# Altium PCB BLDC-Driver-v2.0.PcbDoc (part 2 of 6)
Units mil, origin at the board's own origin, x right, y up, seen from the top; angles counter-clockwise.
Board outline 5905.51 x 4330.71 mil, 4 copper layers (Top Layer, Layer 1, Layer 2, Bottom Layer), stack 62.047 mil thick; 284 components, 198 nets, 819 pads, 521 vias.
Unrouted connection lines stored in the file: 1.
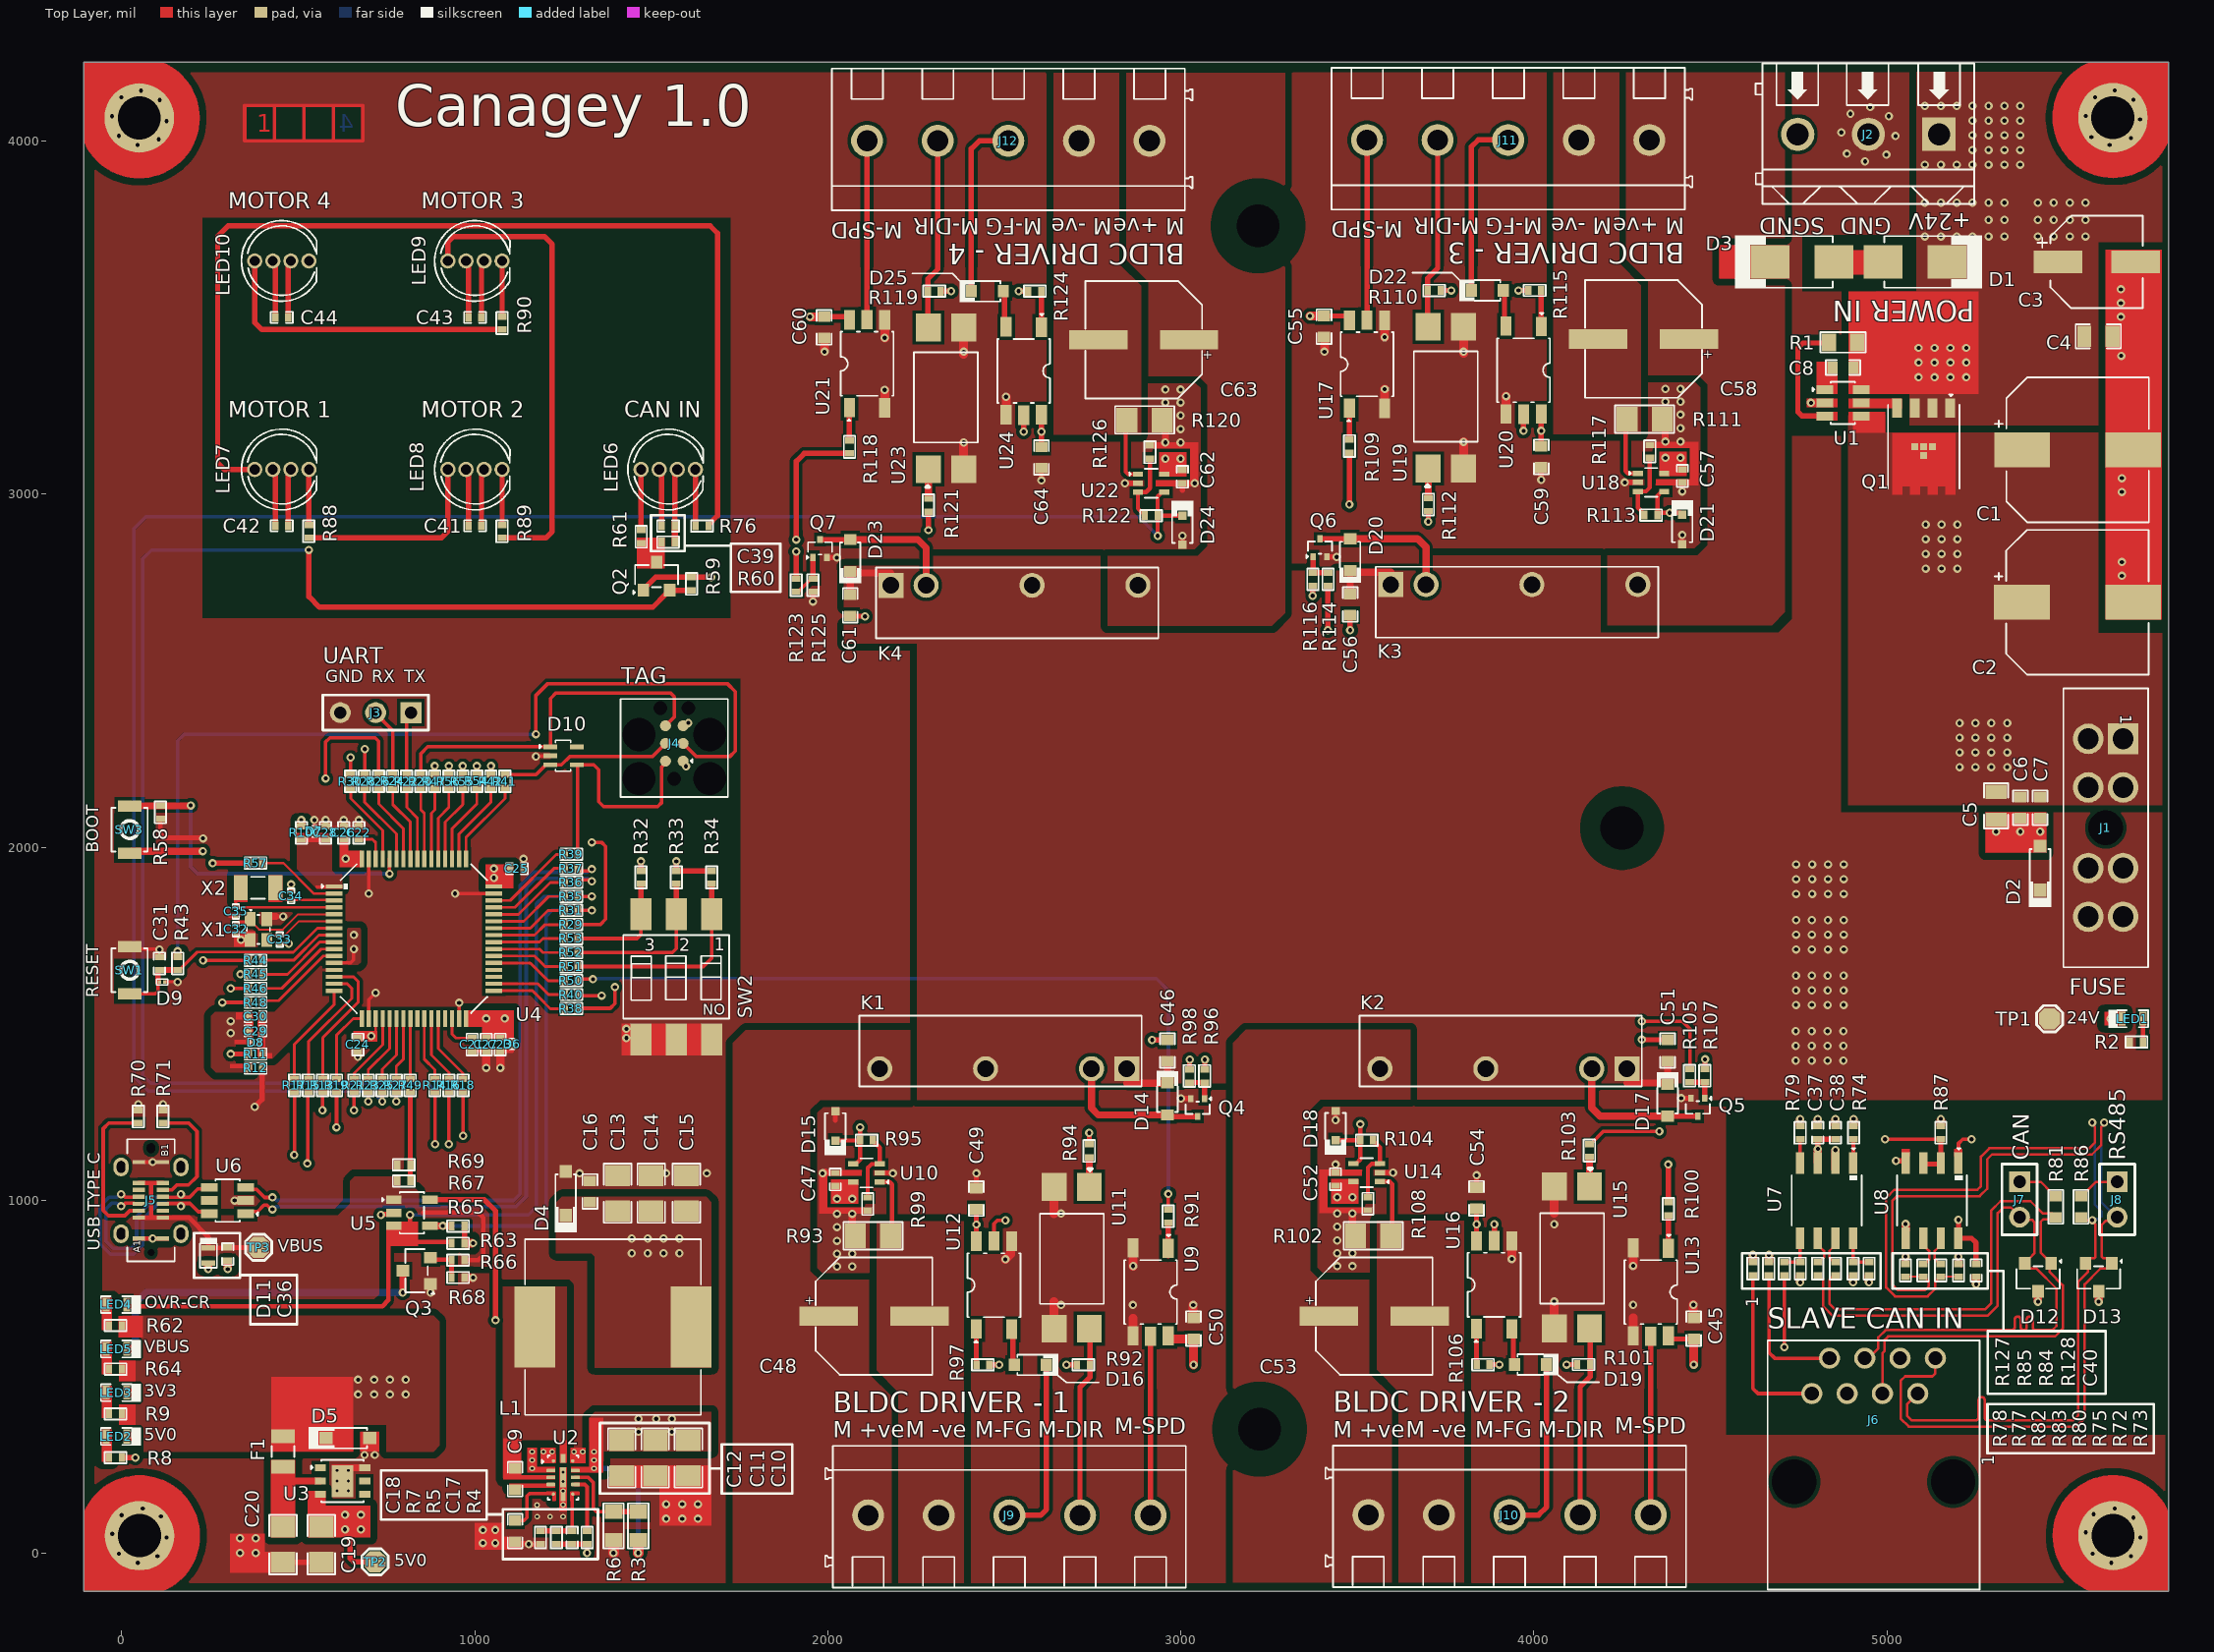
[diagram p0: Top Layer view]

## Part data (continued)
C28 C29: library part CC0402KRX5R7BB105, "CAP CER 1UF 16V X5R 0402", Case Code (Imperial)=0402, Case Code (Metric)=1005, Dielectric=X5R, LCSC Part Number=C325464, Manufacturer=Yageo, Max Operating Temperature=85°C, Min Operating Temperature=-55°C, Supplier Part Number 1=311-1691-6-ND, Tolerance=10%, Voltage Rating=16V, Capacitance=1uF, Case/Package=0402, ComponentLink1Description=http://www.yageo.com/documents/recent/UPY-GPHC_X5R_4V-to-50V_12.pdf?src-supplier=Avnet+Europe, ComponentLink1URL=http://www.yageo.com/documents/recent/UPY-GPHC_X5R_4V-to-50V_12.pdf?src-supplier=Avnet+Europe, Composition=Ceramic, Depth=0.5mm, Halogen Free="Halogen Free", Height=0.5mm, Item Type=Capacitor, Lead Free="Lead Free", Length=1mm, Manufacturer Part Number=CC0402KRX5R7BB105, Mount="Surface Mount", Packaging="Tape and Reel", Pricing 1="1=0.36, 10=0.252, 100=0.1512, 500=0.1134, 1000=0.09576, 2500=0.09072, 5000=0.08568 (USD)", Radiation Hardening=No, Stock 1=1405667, Supplier 1=Digi-Key, Termination=SMD/SMT, Thickness=0.022inch, Voltage Rating (DC)=16V, Weight=2.3E-05oz, Width=0.02inch
C32 C33 C34 C35: library part CC0201JRNPO9BN150, "CAP CER 15PF 50V C0G/NPO 0201", LCSC Part Number=C277480, Manufacturer=Yageo, Supplier Part Number=2580314, Category="Ceramic Capacitors", ComponentLink1Description=https://datasheet.ciiva.com/176/mlccorderingcode-176501.pdf?src-supplier=Digi-Key, ComponentLink1URL=https://datasheet.ciiva.com/176/mlccorderingcode-176501.pdf?src-supplier=Digi-Key, ComponentLink2Description=https://datasheet.ciiva.com/176/mlccorderingcode-176502.pdf?src-supplier=Digi-Key, ComponentLink2URL=https://datasheet.ciiva.com/176/mlccorderingcode-176502.pdf?src-supplier=Digi-Key, ComponentLink3Description=https://datasheet.ciiva.com/176/mlccorderingcode-176503.pdf?src-supplier=Digi-Key, ComponentLink3URL=https://datasheet.ciiva.com/176/mlccorderingcode-176503.pdf?src-supplier=Digi-Key, ComponentLink4Description=https://datasheet.ciiva.com/17205/upy-gp-np0-16v-to-50v-8-17205625.pdf?src-supplier=Future+Electronics, ComponentLink4URL=https://datasheet.ciiva.com/17205/upy-gp-np0-16v-to-50v-8-17205625.pdf?src-supplier=Future+Electronics, Item Type=Capacitor, Manufacturer Part Number=CC0201JRNPO9BN150, Pricing="15000=0.0012, 60000=0.0011, 225000=0.0011, 600000=0.001, 1500000=0.001 (USD)", RoHS=Yes, Stock=585000, Supplier="Future Electronics"
C48 C53 C58 C63: library part SVZ1VM221FBRE00RAXXX, "35V 220uF ±20% 30mΩ@100kHz 2.4A@100kHz SMD,D8xL11.5mm Polymer Aluminum Capacitors ROHS", LCSC Part Number=C2923769, Manufacturer=KNSCHA, Package=SMD,D8xL11.5mm, ComponentLink1Description=LCSC, ComponentLink1URL=https://www.lcsc.com/product-detail/Polymer-Aluminum-Capacitors_AISHI-Aihua-Group-SVZ1VM221FBRE00RAXXX_C2923769.html, Item Type=Capacitor, Manufacturer Part Number=C2923769
D1: "TVS DIODE 58VWM 93.6VC SMB", LCSC Part Number=C135085, Manufacturer=Diodes, ComponentLink1Description=https://datasheet.ciiva.com/25624/0900766b8104bed2-25624843.pdf?src-supplier=Rs, ComponentLink1URL=https://datasheet.ciiva.com/25624/0900766b8104bed2-25624843.pdf?src-supplier=Rs, ComponentLink2Description=https://datasheet.ciiva.com/15143/getdatasheetpartid-39642-15143045.pdf?src-supplier=Verical, ComponentLink2URL=https://datasheet.ciiva.com/15143/getdatasheetpartid-39642-15143045.pdf?src-supplier=Verical, ComponentLink3Description=https://datasheet.ciiva.com/4520/ds19002-4520617.pdf?src-supplier=Mouser, ComponentLink3URL=https://datasheet.ciiva.com/4520/ds19002-4520617.pdf?src-supplier=Mouser, ComponentLink4Description=https://datasheet.ciiva.com/16393/ds19002-16393005.pdf?src-supplier=Future+Electronics, ComponentLink4URL=https://datasheet.ciiva.com/16393/ds19002-16393005.pdf?src-supplier=Future+Electronics, Item Type=Diode, Manufacturer Part Number=SMBJ58A-13-F, Pricing="3000=0.0711, 9000=0.0684, 15000=0.0671, 30000=0.0655, 60000=0.063 (USD)", RoHS=Yes, Stock=6000, Supplier="Future Electronics"
D2: "26.7V 24V SOD-123 ESD and Surge Protection (TVS/ESD) ROHS", LCSC Part Number=C5571859, Manufacturer=AMAZING, Package=SOD-123, ComponentLink1Description=LCSC, ComponentLink1URL=https://www.lcsc.com/product-detail/ESD-and-Surge-Protection-TVS-ESD_AMAZING-AZ4024-01G_C5571859.html, Item Type=(TVS/ESD), Manufacturer Part Number=AZ4024-01G
D3: "TVS DIODE 26VWM 42.1VC SMB", LCSC Part Number=C135062, Manufacturer=Diodes, Supplier Part Number=3363900, ComponentLink1Description=https://datasheet.ciiva.com/15143/getdatasheetpartid-118169-15143570.pdf?src-supplier=Verical, ComponentLink1URL=https://datasheet.ciiva.com/15143/getdatasheetpartid-118169-15143570.pdf?src-supplier=Verical, ComponentLink2Description=https://datasheet.ciiva.com/16211/ds19002-16211003.pdf?src-supplier=Future+Electronics, ComponentLink2URL=https://datasheet.ciiva.com/16211/ds19002-16211003.pdf?src-supplier=Future+Electronics, Item Type="TVS Diodes", Manufacturer Part Number=SMBJ26A-13-F, Pricing="3000=0.0717, 9000=0.069, 15000=0.0677, 30000=0.0661, 60000=0.0635 (USD)", RoHS=Yes, Stock=9000, Supplier="Future Electronics"
D4: "6V 5V SOD-123 ESD and Surge Protection (TVS/ESD) ROHS", LCSC Part Number=C7079241, Manufacturer=AMAZING, Package=SOD-123, ComponentLink1Description=LCSC, ComponentLink1URL=https://www.lcsc.com/product-detail/ESD-and-Surge-Protection-TVS-ESD_AMAZING-AZ3005-01G_C7079241.html, Item Type=(TVS/ESD), Manufacturer Part Number=AZ3005-01G
D5: "TVS SURGE PROTECTOR 1-CH 3.3V", LCSC Part Number=-, Manufacturer=Amazing, Package=SOD-123, ComponentLink1Description=Digikey, ComponentLink1URL=https://www.digikey.com/en/products/detail/amazing/AZ3003-01G/16615352?s=N4IgTCBcDaIIIC0DMAGFSC0KCMBxEAugL5A, Item Type=Diode, Manufacturer Part Number=AZ3003-01G
D6 D7 D8 D9: "DIODE BIDIR ESD X4DFN2", LCSC Part Number=C896720, Manufacturer="ON Semiconductor", Item Type=(TVS/ESD), Manufacturer Part Number=ESDM2033MX4T5G, Pricing="8961=0.04129, 9000=0.04018, 18000=0.03906, 45000=0.03794, 90000=0.03683, 450000=0.03571, 900000=0.0346 (USD)", RoHS=Yes, Series=-, Stock=629400, Supplier=Avnet
D10: "TVS DIODE 3VWM SOT323-5", LCSC Part Number=C703691, Manufacturer=STMicroelectronics, ComponentLink1Description=https://datasheet.ciiva.com/23847/cd00002946-23847220.pdf?src-supplier=Newark, ComponentLink1URL=https://datasheet.ciiva.com/23847/cd00002946-23847220.pdf?src-supplier=Newark, ComponentLink2Description=https://datasheet.ciiva.com/4509/cd00002946-81943-4509940.pdf?src-supplier=Mouser, ComponentLink2URL=https://datasheet.ciiva.com/4509/cd00002946-81943-4509940.pdf?src-supplier=Mouser, ComponentLink3Description=https://datasheet.ciiva.com/5782/cd00002946-5782886.pdf?src-supplier=Farnell, ComponentLink3URL=https://datasheet.ciiva.com/5782/cd00002946-5782886.pdf?src-supplier=Farnell, ComponentLink4Description=https://datasheet.ciiva.com/338/cd00002946-338376.pdf?src-supplier=Digikey, ComponentLink4URL=https://datasheet.ciiva.com/338/cd00002946-338376.pdf?src-supplier=Digikey, ComponentLink5Description=https://datasheet.ciiva.com/338/cd00002946-338377.pdf?src-supplier=Digikey, ComponentLink5URL=https://datasheet.ciiva.com/338/cd00002946-338377.pdf?src-supplier=Digikey, ComponentLink6Description=https://datasheet.ciiva.com/338/cd00002946-338378.pdf?src-supplier=Digikey, ComponentLink6URL=https://datasheet.ciiva.com/338/cd00002946-338378.pdf?src-supplier=Digikey, Item Type="TVS Diodes", Manufacturer Part Number=ESDALC6V1W5, Pricing="3000=0.0569, 9000=0.0547, 12000=0.0774, 15000=0.0538, 30000=0.0749, 45000=0.0518, 75000=0.05 (USD)", RoHS=Yes, Stock=3000, Supplier="Future Electronics"
D11: "TVS DIODE 5VWM 11.6VC 1610", Case Code (Imperial)=0603, Case Code (Metric)=1610, LCSC Part Number=C1975146, Manufacturer=STMicroelectronics, Max Breakdown Voltage=7.2V, Max Operating Temperature=150°C, Min Breakdown Voltage=6.4V, Min Operating Temperature=-55°C, Peak Pulse Current=60A, Peak Pulse Power=700W, Power Line Protection=No, Reverse Standoff Voltage=5V, Case/Package=0603, ComponentLink1Description=http://www.farnell.com/datasheets/2041290.pdf?src-supplier=Farnell, ComponentLink1URL=http://www.farnell.com/datasheets/2041290.pdf?src-supplier=Farnell, ComponentLink2Description=http://www.farnell.com/datasheets/2041290.pdf?src-supplier=Element14, ComponentLink2URL=http://www.farnell.com/datasheets/2041290.pdf?src-supplier=Element14, ComponentLink3Description=http://www.st.com/content/ccc/resource/technical/document/datasheet/44/e9/26/44/42/ee/4f/e5/DM00139972.pdf/files/DM00139972.pdf/jcr:content/translations/en.DM00139972.pdf?src-supplier=Digikey, ComponentLink3URL=http://www.st.com/content/ccc/resource/technical/document/datasheet/44/e9/26/44/42/ee/4f/e5/DM00139972.pdf/files/DM00139972.pdf/jcr:content/translations/en.DM00139972.pdf?src-supplier=Digikey, Diode Type=ZENER, Item Type="TVS Diodes", Manufacturer Part Number=ESDA7P60-1U1M, Mounting Technology="Surface Mount", Number of Unidirectional Channels=1, Packaging="Cut Tape", Pins=2, Polarity=Unidirectional, Pricing="1=0.37, 10=0.245, 50=0.245, 100=0.166, 1000=0.097, 10000=0.077 (USD)", Reach SVHC Compliant=No, RoHS=Yes, RoHS Compliant=Yes, Series=ESDA, Stock=24694, Supplier=Mouser
D12: "TVS DIODE 24VWM 40VC SOT23-3", LCSC Part Number=C350941, Manufacturer=Bourns, ComponentLink1Description=http://www.farnell.com/datasheets/2372435.pdf?src-supplier=Farnell, ComponentLink1URL=http://www.farnell.com/datasheets/2372435.pdf?src-supplier=Farnell, ComponentLink2Description=https://www.bourns.com/docs/Product-Datasheets/cdsot23-t24can-Q.pdf?src-supplier=Digikey, ComponentLink2URL=https://www.bourns.com/docs/Product-Datasheets/cdsot23-t24can-Q.pdf?src-supplier=Digikey, ComponentLink3Description=http://www.farnell.com/datasheets/2372435.pdf?src-supplier=Newark, ComponentLink3URL=http://www.farnell.com/datasheets/2372435.pdf?src-supplier=Newark, Item Type="TVS Diodes", Manufacturer Part Number=CDSOT23-T24CAN-Q, Pricing="1=0.36, 10=0.282, 100=0.1691, 500=0.15656, 1000=0.10645, 3000=0.098, 6000=0.09393, 9000=0.08454, 30000=0.08328, 75000=0.07827 (USD)", RoHS=Yes, RoHS Compliant=5897YesNo, Stock=17231, Supplier=Digikey
D13: "SOT-23 TVS ROHS", LCSC Part Number=C521963, Manufacturer="TECH PUBLIC", Package=SOT-23, ComponentLink1Description=LCSC, ComponentLink1URL=https://www.lcsc.com/product-detail/TVS_TECH-PUBLIC-SM712_C521963.html, Item Type=Diode, Manufacturer Part Number=SM712
D14 D16 D17 D19 D20 D22 D23 D25: "DIODE GEN PURP 75V 150MA SOD323", Average Rectified Current=150mA, Capacitance=2pF, Forward Current=300mA, Forward Voltage=1.25V, LCSC Part Number=C60580, Manufacturer=Diodes, Max Forward Surge Current (Ifsm)=2A, Max Operating Temperature=150°C, Max Repetitive Reverse Voltage (Vrrm)=75V, Max Reverse Current=1uA, Min Operating Temperature=-65°C, Package Quantity=3000, Power Dissipation=200mW, Supplier Part Number 1=621-1N4148WS-F, Category="Rectifier Diodes", ComponentLink1Description=https://datasheet.ciiva.com/1179/ds30097-1179355.pdf?src-supplier=Element14, ComponentLink1URL=https://datasheet.ciiva.com/1179/ds30097-1179355.pdf?src-supplier=Element14, ComponentLink2Description=https://datasheet.ciiva.com/8300/ds30097-8300396.pdf?src-supplier=Avnet, ComponentLink2URL=https://datasheet.ciiva.com/8300/ds30097-8300396.pdf?src-supplier=Avnet, ComponentLink3Description=https://datasheet.ciiva.com/16199/ds30097-16199061.pdf?src-supplier=Future+Electronics, ComponentLink3URL=https://datasheet.ciiva.com/16199/ds30097-16199061.pdf?src-supplier=Future+Electronics, ComponentLink4Description=https://datasheet.ciiva.com/911/ds30097-911742.pdf?src-supplier=Digi-Key, ComponentLink4URL=https://datasheet.ciiva.com/911/ds30097-911742.pdf?src-supplier=Digi-Key, ComponentLink5Description=https://datasheet.ciiva.com/911/ds30097-911743.pdf?src-supplier=Digi-Key, ComponentLink5URL=https://datasheet.ciiva.com/911/ds30097-911743.pdf?src-supplier=Digi-Key, ComponentLink6Description=https://datasheet.ciiva.com/911/ds30097-911741.pdf?src-supplier=Digi-Key, ComponentLink6URL=https://datasheet.ciiva.com/911/ds30097-911741.pdf?src-supplier=Digi-Key, Contact Plating=Tin,Matte, Current Rating=150mA, Element Configuration=Single, Height=1mm, Item Type=Diode, Lead Free="Lead Free", Length=1.8mm, Manufacturer Part Number=1N4148WS-7-F, Max Reverse Voltage (DC)=75V, Max Surge Current=2A, Mount="Surface Mount", Number of Pins=2, Output Current=150mA, Packaging="Tape and Reel", Peak Non-Repetitive Surge Current=2A, Polarity=Standard, Power Rating=200mW, Pricing 1="1=0.19000, 10=0.17500, 50=0.17500, 100=0.09600, 500=0.05900, 1000=0.04000, 3000=0.03000, 9000=0.02600, 10000=0.02600, 24000=0.02300, 45000=0.01900 (USD)", Radiation Hardening=No, REACH SVHC="No SVHC", Recovery Time=4ns, Reverse Recovery Time=4ns, Reverse Recovery Time-Max=4ns, RoHS=Yes, RoHS Compliant=Yes, Series=-, Supplier 1=Mouser, Voltage=75V, Voltage Rating (DC)=75V, Weight=0.000173oz, Width=1.4mm
D15 D18 D21 D24: "DIODE ZENER 3.3V 200MW SOD323F", Forward Voltage=1V, LCSC Part Number=C2978865, Manufacturer="ON Semiconductor / Fairchild", Max Operating Temperature=150°C, Max Power Dissipation=200mW, Max Reverse Leakage Current=4.5uA, Min Operating Temperature=-65°C, Package Quantity=1, Supplier Part Number 1=MM3Z3V3BCT-ND, Test Current=5mA, Tolerance=2%, Working Voltage=3.3V, ComponentLink1Description=http://www.onsemi.com/pub/Collateral/MM3Z9V1B-D.pdf?src-supplier=Digi-Key, ComponentLink1URL=http://www.onsemi.com/pub/Collateral/MM3Z9V1B-D.pdf?src-supplier=Digi-Key, ComponentLink2Description=http://www.mouser.com/ds/2/149/MM3Z3V3B-187166.pdf?src-supplier=Mouser, ComponentLink2URL=http://www.mouser.com/ds/2/149/MM3Z3V3B-187166.pdf?src-supplier=Mouser, ComponentLink3Description=https://www.fairchildsemi.com/datasheets/MM/MM3Z9V1B.pdf?src-supplier=Avnet, ComponentLink3URL=https://www.fairchildsemi.com/datasheets/MM/MM3Z9V1B.pdf?src-supplier=Avnet, ComponentLink4Description=http://www.farnell.com/datasheets/1706525.pdf?src-supplier=Element14, ComponentLink4URL=http://www.farnell.com/datasheets/1706525.pdf?src-supplier=Element14, Element Configuration=Single, Height=1mm, Impedance=89R, Item Type=Diode, Lead Free="Lead Free", Length=1.3mm, Manufacturer Part Number=MM3Z3V3B, Mount="Surface Mount", Number of Pins=2, Packaging="Tape and Reel", Peak Reverse Current=4.5uA, Power Dissipation=200mW, Pricing 1="1=0.22, 10=0.18, 100=0.0956, 500=0.06288, 1000=0.04276 (USD)", Radiation Hardening=No, REACH SVHC="No SVHC", Stock 1=473644, Supplier 1=Digi-Key, Voltage Tolerance=2%, Weight=0.0276g, Width=1.7mm, Zener Voltage=3.3V
F1: "PTC RESET FUSE 6V 1.1A 0805", LCSC Part Number=C207024, Manufacturer=Littelfuse, ComponentLink1Description=https://datasheet.ciiva.com/326/littelfuse-resettable-ptcs-lorho-datasheet-326160.pdf?src-supplier=Digikey, ComponentLink1URL=https://datasheet.ciiva.com/326/littelfuse-resettable-ptcs-lorho-datasheet-326160.pdf?src-supplier=Digikey, ComponentLink2Description=https://datasheet.ciiva.com/28410/949281-28410775.pdf?src-supplier=Element14, ComponentLink2URL=https://datasheet.ciiva.com/28410/949281-28410775.pdf?src-supplier=Element14, Item Type=Fuses, Manufacturer Part Number=0805L110SLYR, Pricing="1=1.74, 5=1.448, 10=1.339, 50=1.1156, 100=1.0309, 250=0.92832, 500=0.85714, 1000=0.79108 (USD)", RoHS=Yes, Stock=3032, Supplier=Digikey
J1: "FUSE HOLDER BLADE 80V PCB", Current Rating=30A, LCSC Part Number=C207061, Manufacturer="Littelfuse Wickmann", Supplier Part Number=9883406, Body Material=4896ConductorMaterial, Category="Fuse Holders", ComponentLink1Description=https://datasheet.ciiva.com/295/littelfuse-ato-pcb-fuse-holders-178-6765-295568.pdf?src-supplier=Digikey, ComponentLink1URL=https://datasheet.ciiva.com/295/littelfuse-ato-pcb-fuse-holders-178-6765-295568.pdf?src-supplier=Digikey, ComponentLink2Description=https://datasheet.ciiva.com/4480/flrholder-58019-4480354.pdf?src-supplier=Mouser, ComponentLink2URL=https://datasheet.ciiva.com/4480/flrholder-58019-4480354.pdf?src-supplier=Mouser, ComponentLink3Description=https://datasheet.ciiva.com/16372/flrholder-16372408.pdf?src-supplier=Future+Electronics, ComponentLink3URL=https://datasheet.ciiva.com/16372/flrholder-16372408.pdf?src-supplier=Future+Electronics, ComponentLink4Description=https://datasheet.ciiva.com/15187/getdatasheetpartid-31610-15187861.pdf?src-supplier=Verical, ComponentLink4URL=https://datasheet.ciiva.com/15187/getdatasheetpartid-31610-15187861.pdf?src-supplier=Verical, Item Type="Fuse Holder", Lead Free=5697LeadFree, Manufacturer Part Number=178.6165.0002, Material=4896ConductorMaterial, Pricing="1=2.02, 40=1.96, 125=1.91, 400=1.86, 1250=1.77 (USD)", RoHS=Yes, Stock=3811, Supplier="Future Electronics", Thickness=6mm, Width=17.5mm
J2: "1x3P 18A -40℃~+105℃ 250V Orange 12~30 Direct Insert 5.08mm 2.5 1 3 Plugin,P=5.08mm Screw Terminal Blocks ROHS", LCSC Part Number=C430604, Manufacturer=DORABO, Package=Plugin,P=5.08mm, ComponentLink1Description=LCSC, ComponentLink1URL=https://www.lcsc.com/product-detail/Screw-Terminal-Blocks_DORABO-DB128L-5-08-3P-OG-S_C430604.html, Item Type="Terminal Block", Manufacturer Part Number=DB128L-5.08-3P-OG-S
J3: "Gold 250V 3A Straight Square Pins 2.5mm 3P 260℃ 6mm -40℃~+105℃ 3mm 2.54mm Plugin Black Brass 1x3P Plugin,P=2.54mm Pin Headers ROHS", LCSC Part Number=C706875, Manufacturer=XKB, Package=Plugin,P=2.54mm, ComponentLink1Description=LCSC, ComponentLink1URL=https://www.lcsc.com/product-detail/Pin-Headers_XKB-Connectivity-X6511WV-03H-C60D30_C706875.html, Item Type="Male Header", Manufacturer Part Number=X6511WV-03H-C60D30
J4: "CABLE ADAPTER 6 POS", Manufacturer=Tag-Connect, Package Quantity=1, Supplier Part Number 1=TC2030-IDC-ND, ComponentLink1Description=http://www.tag-connect.com/Materials/TC2030-MCP%20Datasheet.pdf?src-supplier=Digi-Key, ComponentLink1URL=http://www.tag-connect.com/Materials/TC2030-MCP%20Datasheet.pdf?src-supplier=Digi-Key, Manufacturer Part Number=TC2030-IDC, Pricing 1="1=43.71 (USD)", Stock 1=284, Supplier 1=Digi-Key
J5: "5A 1 16P Mother -25℃~+85℃ Type-C SMD USB Connectors ROHS", LCSC Part Number=C2938598, Manufacturer="XKB Connection", Package=SMD, ComponentLink1Description=LCSC, ComponentLink1URL=https://www.lcsc.com/product-detail/USB-Connectors_XKB-Connection-U263-163N-4BQC65_C2938598.html, Item Type="USB Connectors", Manufacturer Part Number=U263-163N-4BQC65
J6: "RJ45Receptacle Unshielded 1 Bend-in Gold Phosphor Bronze Without LED Plugin Ethernet Connectors / Modular Connectors (RJ45 RJ11) ROHS", LCSC Part Number=C3000205, Manufacturer=HCTL, Package=Custom, ComponentLink1Description=LCSC, ComponentLink1URL=https://www.lcsc.com/product-detail/Ethernet-Connectors-Modular-Connectors-RJ45-RJ11_HCTL-HC-RJ45-5622-1-6-Y_C3000205.html, Item Type="Ethernet Connectors", Manufacturer Part Number=HC-RJ45-5622-1-6-Y
J7 J8: "Gold 250V 3A Straight Square Pins 2.5mm 2P 260℃ 6mm -40℃~+105℃ 3mm 2.54mm Plugin Black Brass 1x2P Plugin,P=2.54mm Pin Headers ROHS", LCSC Part Number=C706874, Manufacturer=XKB, Package=Plugin,P=2.54mm, ComponentLink1Description=LCSC, ComponentLink1URL=https://www.lcsc.com/product-detail/Pin-Headers_XKB-Connectivity-X6511WV-02H-C60D30_C706874.html, Item Type="Male Header", Manufacturer Part Number=X6511WV-02H-C60D30
J9 J10 J11 J12: "1x5P 20A -40℃~+105℃ 300V Green 12~30 Direct Insert 5.08mm 2.5 1 5 Plugin,P=5.08mm Screw Terminal Blocks ROHS", LCSC Part Number=C2927513, Manufacturer=DORABO, Package=Plugin,P=5.08mm, ComponentLink1Description=LCSC, ComponentLink1URL=https://www.lcsc.com/product-detail/Screw-Terminal-Blocks_DORABO-DB128V-5-08-5P-GN-S_C2927513.html, Item Type="Terminal Block", Manufacturer Part Number=DB128V-5.08-5P-GN-S
K1 K2 K3 K4: "RELAY GEN PURPOSE SPST 5A 24V", LCSC Part Number=C397209, Manufacturer=Omron, ComponentLink1Description=http://datasheet.octopart.com/G6DN-1A-SL-DC24-Omron-datasheet-138102761.pdf?src-supplier=Rs, ComponentLink1URL=http://datasheet.octopart.com/G6DN-1A-SL-DC24-Omron-datasheet-138102761.pdf?src-supplier=Rs, ComponentLink2Description=http://datasheet.octopart.com/G6DN-1A-SL-DC24-Omron-datasheet-138102761.pdf?src-supplier=Newark, ComponentLink2URL=http://datasheet.octopart.com/G6DN-1A-SL-DC24-Omron-datasheet-138102761.pdf?src-supplier=Newark, ComponentLink3Description=http://datasheet.octopart.com/G6DN-1A-SL-DC24-Omron-datasheet-138102761.pdf?src-supplier=Mouser, ComponentLink3URL=http://datasheet.octopart.com/G6DN-1A-SL-DC24-Omron-datasheet-138102761.pdf?src-supplier=Mouser, ComponentLink4Description=http://datasheet.octopart.com/G6DN-1A-SL-DC24-Omron-datasheet-138102761.pdf?src-supplier=Allied+Electronics, ComponentLink4URL=http://datasheet.octopart.com/G6DN-1A-SL-DC24-Omron-datasheet-138102761.pdf?src-supplier=Allied+Electronics, ComponentLink5Description=http://datasheet.octopart.com/G6DN-1A-SL-DC24-Omron-datasheet-138102761.pdf?src-supplier=Farnell, ComponentLink5URL=http://datasheet.octopart.com/G6DN-1A-SL-DC24-Omron-datasheet-138102761.pdf?src-supplier=Farnell, ComponentLink6Description=http://datasheet.octopart.com/G6DN-1A-SL-DC24-Omron-datasheet-138102761.pdf?src-supplier=Digikey, ComponentLink6URL=http://datasheet.octopart.com/G6DN-1A-SL-DC24-Omron-datasheet-138102761.pdf?src-supplier=Digikey, ComponentLink7Description=http://datasheet.octopart.com/G6DN-1A-SL-DC24-Omron-datasheet-138102761.pdf?src-supplier=Sager+Electronics, ComponentLink7URL=http://datasheet.octopart.com/G6DN-1A-SL-DC24-Omron-datasheet-138102761.pdf?src-supplier=Sager+Electronics, Item Type="Power Relays", Manufacturer Part Number=G6DN-1A-SLDC24, Pricing="1=2.37, 10=2.078, 25=2.068, 40=1.8325, 100=1.519, 300=1.47, 500=1.41912 (USD)", RoHS=No, Stock=457, Supplier=Digikey
L1: library part SRP1265A-150M, "FIXED IND 15UH 9A 28 MOHM SMD", LCSC Part Number=C189912, Manufacturer=Bourns, ComponentLink1Description=http://www.mouser.com/ds/2/54/SRP1265A-558458.pdf?src-supplier=Mouser, ComponentLink1URL=http://www.mouser.com/ds/2/54/SRP1265A-558458.pdf?src-supplier=Mouser, ComponentLink2Description=https://media.digikey.com/pdf/Data%20Sheets/Bourns%20PDFs/SRP_Series_Bltn.pdf?src-supplier=Digikey, ComponentLink2URL=https://media.digikey.com/pdf/Data%20Sheets/Bourns%20PDFs/SRP_Series_Bltn.pdf?src-supplier=Digikey, ComponentLink3Description=http://components.arrow.com/part/dataview/66888460S852199N9116?src-supplier=Arrow+Electronics, ComponentLink3URL=http://components.arrow.com/part/dataview/66888460S852199N9116?src-supplier=Arrow+Electronics, ComponentLink4Description=http://www.farnell.com/datasheets/2059704.pdf?src-supplier=Farnell, ComponentLink4URL=http://www.farnell.com/datasheets/2059704.pdf?src-supplier=Farnell, ComponentLink5Description=http://uk.rs-online.com/webdocs/133a/0900766b8133ab5d.pdf?src-supplier=Rs, ComponentLink5URL=http://uk.rs-online.com/webdocs/133a/0900766b8133ab5d.pdf?src-supplier=Rs, ComponentLink6Description=http://www.alliedelec.com/images/products/datasheets/bm/BOURNS/70377570.pdf?src-supplier=Allied+Electronics, ComponentLink6URL=http://www.alliedelec.com/images/products/datasheets/bm/BOURNS/70377570.pdf?src-supplier=Allied+Electronics, ComponentLink7Description=https://datasheet.octopart.com/SRP1265A-150M-Bourns-datasheet-57227458.pdf?src-supplier=Newark, ComponentLink7URL=https://datasheet.octopart.com/SRP1265A-150M-Bourns-datasheet-57227458.pdf?src-supplier=Newark, ComponentLink8Description=http://www.bourns.com/data/global/pdfs/SRP1265A.pdf?src-supplier=Avnet, ComponentLink8URL=http://www.bourns.com/data/global/pdfs/SRP1265A.pdf?src-supplier=Avnet, ComponentLink9Description=http://www.farnell.com/datasheets/2059704.pdf?src-supplier=Newark, ComponentLink9URL=http://www.farnell.com/datasheets/2059704.pdf?src-supplier=Newark, ComponentLink10Description=http://www.farnell.com/datasheets/2059704.pdf?src-supplier=Element14, ComponentLink10URL=http://www.farnell.com/datasheets/2059704.pdf?src-supplier=Element14, Item Type=Inductors, Manufacturer Part Number=SRP1265A-150M, Pricing="1=1.86, 10=1.446, 25=1.3076, 50=1.2114, 100=1.1221, 250=1.0136 (USD)", RoHS=Yes, Stock=3333, Supplier=Digikey
LED1 LED2 LED3 LED4: library part NCD0603R3, "RED LED 0603 Light Emitting Diodes", LCSC Part Number=C3151730, Manufacturer="Foshan NationStar Optoelectronics", Package=0603, ComponentLink1Description=LCSC, ComponentLink1URL=https://www.lcsc.com/product-detail/Light-Emitting-Diodes-LED_Foshan-NationStar-Optoelectronics-NCD0603R3_C3151730.html, Item Type=LED, Manufacturer Part Number=NCD0603R3
LED5: library part NCD0603G2, "Emerald 0603 Light Emitting Diodes (LED) ROHS", LCSC Part Number=C87326, Manufacturer="Foshan NationStar Optoelectronics", Package=0603, ComponentLink1Description=LCSC, ComponentLink1URL=https://www.lcsc.com/product-detail/Light-Emitting-Diodes-LED_Foshan-NationStar-Optoelectronics-NCD0603G2_C87326.html, Item Type=LED, Manufacturer Part Number=NCD0603G2
LED6 LED7 LED8 LED9 LED10: "Plugin,D=5mm RGB LEDs ROHS", LCSC Part Number=C190565, Manufacturer=Worldsemi, Package=Plugin,D=5mm, ComponentLink1Description=LCSC, ComponentLink1URL=https://jlcpcb.com/partdetail/Worldsemi-WS2812DF5/C190565, Item Type="RGB LED", Manufacturer Part Number=WS2812D-F5
Q1: "MOSFET N-CH 60V 100A 8VSON", LCSC Part Number=C2876541, Manufacturer="Texas Instruments", ComponentLink1Description=http://www.ti.com/general/docs/lit/getliterature.tsp?genericPartNumber=CSD18532Q5B&&fileType=pdf&src-supplier=Avnet, ComponentLink1URL=http://www.ti.com/general/docs/lit/getliterature.tsp?genericPartNumber=CSD18532Q5B&&fileType=pdf&src-supplier=Avnet, ComponentLink2Description=http://www.ti.com/general/docs/suppproductinfo.tsp?distId=10&amp;gotoUrl=http%3A%2F%2Fwww.ti.com%2Flit%2Fgpn%2Fcsd18532q5b&src-supplier=Digikey, ComponentLink2URL=http://www.ti.com/general/docs/suppproductinfo.tsp?distId=10&amp;gotoUrl=http%3A%2F%2Fwww.ti.com%2Flit%2Fgpn%2Fcsd18532q5b&src-supplier=Digikey, ComponentLink3Description=http://www.ti.com/lit/ds/symlink/csd18532q5b.pdf?src-supplier=Digikey, ComponentLink3URL=http://www.ti.com/lit/ds/symlink/csd18532q5b.pdf?src-supplier=Digikey, ComponentLink4Description=http://www.ti.com/lit/gpn/csd18532q5b?src-supplier=Mouser, ComponentLink4URL=http://www.ti.com/lit/gpn/csd18532q5b?src-supplier=Mouser, Item Type=MOSFETs, Manufacturer Part Number=CSD18532Q5BT, Pricing="1=2.24, 10=2.01, 50=2.01, 100=1.79, 1000=1.34, 10000=1.23 (USD)", RoHS=Yes, Stock=1375, Supplier=Mouser
Q2: "N-CHANNEL 20-V (D-S) MOSFET", LCSC Part Number=C5310968, Manufacturer="TECH PUBLIC", Manufacturer Part Number=SI2302CDS, Package=SOT-23, ComponentLink1Description=LCSC, ComponentLink1URL=https://www.lcsc.com/product-detail/MOSFETs_TECH-PUBLIC-SI2302CDS_C5310968.html, Item Type=Mosfet
Q3: "40V 200mW 100 200mA NPN SOT-23 Bipolar (BJT) ROHS", LCSC Part Number=C5249683, Manufacturer=ElecSuper, Package=SOT-23, ComponentLink1Description=LCSC, ComponentLink1URL=https://www.lcsc.com/product-detail/Bipolar-BJT_ElecSuper-MMBT3904_C5249683.html, Item Type=(BJT), Manufacturer Part Number=MMBT3904
Q4 Q5 Q6 Q7: "TRANS NPN 40V 0.2A SOT523", LCSC Part Number=C239187, Manufacturer="Diodes Zetex", Supplier Part Number=4140292, Category=BJTs, ComponentLink1Description=https://datasheet.ciiva.com/15139/getdatasheetpartid-142850-15139485.pdf?src-supplier=Verical, ComponentLink1URL=https://datasheet.ciiva.com/15139/getdatasheetpartid-142850-15139485.pdf?src-supplier=Verical, ComponentLink2Description=https://datasheet.ciiva.com/11199/ds30270-11199009.pdf?src-supplier=Avnet, ComponentLink2URL=https://datasheet.ciiva.com/11199/ds30270-11199009.pdf?src-supplier=Avnet, ComponentLink3Description=https://datasheet.ciiva.com/17053/0900766b80e49818-17053736.pdf?src-supplier=Allied+Electronics, ComponentLink3URL=https://datasheet.ciiva.com/17053/0900766b80e49818-17053736.pdf?src-supplier=Allied+Electronics, ComponentLink4Description=https://datasheet.ciiva.com/8029/ds30270-8029717.pdf?src-supplier=Element14, ComponentLink4URL=https://datasheet.ciiva.com/8029/ds30270-8029717.pdf?src-supplier=Element14, ComponentLink5Description=https://datasheet.ciiva.com/22711/480146-22711751.pdf?src-supplier=Element14, ComponentLink5URL=https://datasheet.ciiva.com/22711/480146-22711751.pdf?src-supplier=Element14, ComponentLink6Description=https://datasheet.ciiva.com/4723/ds30270-4723401.pdf?src-supplier=Mouser, ComponentLink6URL=https://datasheet.ciiva.com/4723/ds30270-4723401.pdf?src-supplier=Mouser, ComponentLink7Description=https://datasheet.ciiva.com/6360/ds30270-6360919.pdf?src-supplier=Digikey, ComponentLink7URL=https://datasheet.ciiva.com/6360/ds30270-6360919.pdf?src-supplier=Digikey, Item Type=Transistor, Manufacturer Part Number=MMBT3904T-7-F, Pricing="3000=0.0261, 9000=0.0252, 15000=0.0248, 60000=0.0236, 90000=0.0229 (USD)", RoHS=Yes, Stock=36000, Supplier="Future Electronics"
R1: library part RC0805FR-07100KL, "RES 100K OHM 1% 1/8W 0805", Case Code (Imperial)=0805, Case Code (Metric)=2012, LCSC Part Number=C96346, Manufacturer=Yageo, Max Operating Temperature=155°C, Max Power Dissipation=125mW, Min Operating Temperature=-55°C, Package Quantity=1, Resistance=100kR, Resistance Tolerance=1%, Resistor Type="Thick Film", Temperature Coefficient=100ppm/°C, Voltage Rating=150V, Case/Package=0805, Category="Chip SMD Resistors", ComponentLink1Description=https://datasheet.ciiva.com/11808/0900766b8106beab-11808858.pdf?src-supplier=RSComponents, ComponentLink1URL=https://datasheet.ciiva.com/11808/0900766b8106beab-11808858.pdf?src-supplier=RSComponents, ComponentLink2Description=https://datasheet.ciiva.com/7941/1686128-7941677.pdf?src-supplier=Element14, ComponentLink2URL=https://datasheet.ciiva.com/7941/1686128-7941677.pdf?src-supplier=Element14, ComponentLink3Description=https://datasheet.ciiva.com/7660/38627-7660796.pdf?src-supplier=Element14, ComponentLink3URL=https://datasheet.ciiva.com/7660/38627-7660796.pdf?src-supplier=Element14, ComponentLink4Description=https://datasheet.ciiva.com/22747/444164-22747534.pdf?src-supplier=Element14, ComponentLink4URL=https://datasheet.ciiva.com/22747/444164-22747534.pdf?src-supplier=Element14, ComponentLink5Description=https://datasheet.ciiva.com/2457/pyu-r-int-thick-7-2457018.pdf?src-supplier=Digi-Key, ComponentLink5URL=https://datasheet.ciiva.com/2457/pyu-r-int-thick-7-2457018.pdf?src-supplier=Digi-Key, ComponentLink6Description=https://datasheet.ciiva.com/2457/pyu-r-int-thick-7-2457019.pdf?src-supplier=Digi-Key, ComponentLink6URL=https://datasheet.ciiva.com/2457/pyu-r-int-thick-7-2457019.pdf?src-supplier=Digi-Key, ComponentLink7Description=https://datasheet.ciiva.com/2457/pyu-r-int-thick-7-2457017.pdf?src-supplier=Digi-Key, ComponentLink7URL=https://datasheet.ciiva.com/2457/pyu-r-int-thick-7-2457017.pdf?src-supplier=Digi-Key, ComponentLink8Description=https://datasheet.ciiva.com/12667/rc0805-12667001.pdf?src-supplier=Mouser, ComponentLink8URL=https://datasheet.ciiva.com/12667/rc0805-12667001.pdf?src-supplier=Mouser, ComponentLink9Description=https://datasheet.ciiva.com/7941/1697719-7941676.pdf?src-supplier=Element14, ComponentLink9URL=https://datasheet.ciiva.com/7941/1697719-7941676.pdf?src-supplier=Element14, ComponentLink10Description=https://datasheet.ciiva.com/7941/1697719-7941678.pdf?src-supplier=Element14, ComponentLink10URL=https://datasheet.ciiva.com/7941/1697719-7941678.pdf?src-supplier=Element14, ComponentLink11Description=https://datasheet.ciiva.com/16747/rc0805-16747226.pdf?src-supplier=Future+Electronics, ComponentLink11URL=https://datasheet.ciiva.com/16747/rc0805-16747226.pdf?src-supplier=Future+Electronics, Construction=Rectangular, Depth=1.25mm, Features="Moisture Resistant", Height=0.024inch, Item Type=Resistor, Lead Free="Lead Free", Lead Pitch=0.4mm, Length=0.079inch, Manufacturer Part Number=RC0805FR-07100KL, Military Standard=Not, Number of Pins=2, Number of Terminations=2, Packaging="Tape and Reel", Power Rating=125mW, Pricing 1="5000=0.00227, 10000=0.00224, 20000=0.00217 (USD)", RoHS=Yes, RoHS Compliant=Yes, Series=RC, Size Code=0805, Stock 1=695000, Supplier 1=Avnet, Supplier Part Number 1=RC0805FR-07100KL, Technology="THICK FILM", Termination=SMD/SMT, Tolerance=1%, Voltage Rating (DC)=150V, Width=0.049inch
R2: library part RC0402FR-073K9L, "RES 3.9K OHM 1% 1/16W 0402", Case Code (Imperial)=0402, Case Code (Metric)=1005, LCSC Part Number=C131467, Manufacturer=Yageo, Max Operating Temperature=155°C, Max Power Dissipation=63mW, Min Operating Temperature=-55°C, Power Rating=62.5mW, Resistance Tolerance=1%, Resistor Type="Thick Film", Supplier Part Number=9808155, Temperature Coefficient=100ppm/°C, Voltage Rating=50V, Case/Package=0402, Category="Chip SMD Resistors", ComponentLink1Description=https://datasheet.ciiva.com/12666/pyu-rc0402-51-rohs-l-6-r-12666997.pdf?src-supplier=Mouser, ComponentLink1URL=https://datasheet.ciiva.com/12666/pyu-rc0402-51-rohs-l-6-r-12666997.pdf?src-supplier=Mouser, ComponentLink2Description=https://datasheet.ciiva.com/7849/1018594-7849989.pdf?src-supplier=Element14, ComponentLink2URL=https://datasheet.ciiva.com/7849/1018594-7849989.pdf?src-supplier=Element14, ComponentLink3Description=https://datasheet.ciiva.com/7849/1018594-7849990.pdf?src-supplier=Element14, ComponentLink3URL=https://datasheet.ciiva.com/7849/1018594-7849990.pdf?src-supplier=Element14, ComponentLink4Description=https://datasheet.ciiva.com/15189/getdatasheetpartid-469246-15189453.pdf?src-supplier=Verical, ComponentLink4URL=https://datasheet.ciiva.com/15189/getdatasheetpartid-469246-15189453.pdf?src-supplier=Verical, Construction=Rectangular, Depth=0.5mm, Features="Moisture Resistant", Item Type=Resistor, Lead Free="Lead Free", Length=1mm, Manufacturer Part Number=RC0402FR-073K9L, Military Standard=Not, Number of Terminations=2, Packaging="Tape and Reel", Pricing="10000=0.0011, 100000=0.0011, 300000=0.001, 750000=0.001, 2000000=0.0009 (USD)", Reach SVHC Compliant=Unknown, RoHS=Yes, RoHS Compliant=Yes, Series=RC, Stock=6910000, Supplier="Future Electronics", Termination=SMD/SMT, Tolerance=1%, Voltage Rating (AC)=50V
R3: library part RT0805BRD07698KL, "RES SMD 698K OHM 0.1% 1/8W 0805", Case Code (Imperial)=0805, Case Code (Metric)=2012, LCSC Part Number=C865618, Manufacturer=Yageo, Max Operating Temperature=155°C, Max Power Dissipation=125mW, Min Operating Temperature=-55°C, Package Quantity=5000, Temperature Coefficient=25ppm/°C, Tolerance=0.1%, Voltage Rating=150V, Case/Package=0805, ComponentLink1Description=https://datasheet.ciiva.com/2585/pyu-rt-1-to-0-05-rohs-l-4-2585147.pdf?src-supplier=Digikey, ComponentLink1URL=https://datasheet.ciiva.com/2585/pyu-rt-1-to-0-05-rohs-l-4-2585147.pdf?src-supplier=Digikey, ComponentLink2Description=https://datasheet.ciiva.com/46635/pyu-rt-1-to-0-05-rohs-l-5-46635259.pdf?src-supplier=Digikey, ComponentLink2URL=https://datasheet.ciiva.com/46635/pyu-rt-1-to-0-05-rohs-l-5-46635259.pdf?src-supplier=Digikey, ComponentLink3Description=https://datasheet.ciiva.com/12705/pyu-rt-1-to-0-05-rohs-l-4-12705823.pdf?src-supplier=Mouser, ComponentLink3URL=https://datasheet.ciiva.com/12705/pyu-rt-1-to-0-05-rohs-l-4-12705823.pdf?src-supplier=Mouser, Features="Moisture Resistant", Height=0.024inch, Item Type=Resistor, Lead Free="Lead Free", Length=0.079inch, Manufacturer Part Number=RT0805BRD07698KL, Number of Terminations=2, Packaging="Tape and Reel", Power Rating=125mW, Pricing="1=0.16, 10=0.122, 50=0.0968, 100=0.0867, 500=0.0663, 1000=0.05814 (USD)", RoHS=Yes, RoHS Compliant=Yes, Series=RT, Stock=881, Supplier=Digikey, Termination=SMD/SMT, Voltage Rating (DC)=150V, Width=0.049inch
R4 R5: library part RT0402BRD07100KL, "RES SMD 100K OHM 0.1% 1/16W 0402", LCSC Part Number=C852472, Manufacturer=Yageo, Supplier Part Number=YAG1343CT-ND, Voltage Rating (DC)=50V, Category="Chip SMD Resistors", ComponentLink1Description=https://datasheet.ciiva.com/12724/pyu-rt-1-to-0-05-rohs-l-4-12724954.pdf?src-supplier=Mouser, ComponentLink1URL=https://datasheet.ciiva.com/12724/pyu-rt-1-to-0-05-rohs-l-4-12724954.pdf?src-supplier=Mouser, Item Type=Resistor, Manufacturer Part Number=RT0402BRD07100KL, Pricing="1=0.16, 10=0.121, 50=0.0958, 100=0.0859, 500=0.0654, 1000=0.0578, 5000=0.04283 (USD)", RoHS=Yes, Stock=62932, Supplier=Digikey
R6: library part RT0805BRD0751K1L, "RES SMD 51.1K OHM 0.1% 1/8W 0805", Case Code (Imperial)=0805, Case Code (Metric)=2012, LCSC Part Number=C865541, Manufacturer=Yageo, Max Operating Temperature=155°C, Max Power Dissipation=125mW, Min Operating Temperature=-55°C, Package Quantity=5000, Temperature Coefficient=25ppm/°C, Tolerance=0.1%, Voltage Rating=150V, Case/Package=0805, ComponentLink1Description=https://datasheet.ciiva.com/12811/pyu-rt-1-to-0-05-rohs-l-4-12811148.pdf?src-supplier=Mouser, ComponentLink1URL=https://datasheet.ciiva.com/12811/pyu-rt-1-to-0-05-rohs-l-4-12811148.pdf?src-supplier=Mouser, ComponentLink2Description=https://datasheet.ciiva.com/2585/pyu-rt-1-to-0-05-rohs-l-5-2585074.pdf?src-supplier=Digikey, ComponentLink2URL=https://datasheet.ciiva.com/2585/pyu-rt-1-to-0-05-rohs-l-5-2585074.pdf?src-supplier=Digikey, Height=0.024inch, Item Type=Resistors, Lead Free="Lead Free", Length=0.079inch, Manufacturer Part Number=RT0805BRD0751K1L, Number of Terminations=2, Packaging="Tape and Reel", Power Rating=125mW, Pricing="1=0.16, 10=0.122, 50=0.0968, 100=0.0867, 500=0.0663, 1000=0.05814 (USD)", RoHS=Yes, RoHS Compliant=Yes, Series=RT, Stock=5132, Supplier=Digikey, Termination=SMD/SMT, Voltage Rating (DC)=150V, Weight=0.000194oz, Width=1.2mm
R7: library part RT0402BRD0724K9L, "RES SMD 24.9KOHM 0.1% 1/16W 0402", LCSC Part Number=C852664, Manufacturer=Yageo, ComponentLink1Description=https://datasheet.ciiva.com/2582/pyu-rt-1-to-0-05-rohs-l-4-2582251.pdf?src-supplier=Digikey, ComponentLink1URL=https://datasheet.ciiva.com/2582/pyu-rt-1-to-0-05-rohs-l-4-2582251.pdf?src-supplier=Digikey, ComponentLink2Description=https://datasheet.ciiva.com/12721/pyu-rt-1-to-0-05-rohs-l-4-12721846.pdf?src-supplier=Mouser, ComponentLink2URL=https://datasheet.ciiva.com/12721/pyu-rt-1-to-0-05-rohs-l-4-12721846.pdf?src-supplier=Mouser, ComponentLink3Description=https://datasheet.ciiva.com/46635/pyu-rt-1-to-0-05-rohs-l-5-46635119.pdf?src-supplier=Digikey, ComponentLink3URL=https://datasheet.ciiva.com/46635/pyu-rt-1-to-0-05-rohs-l-5-46635119.pdf?src-supplier=Digikey, Item Type=Resistors, Manufacturer Part Number=RT0402BRD0724K9L, Pricing="10000=0.0362, 20000=0.0356, 30000=0.0353, 50000=0.0349, 100000=0.0341 (USD)", RoHS=Yes, Stock=40000, Supplier="Future Electronics"
R8: library part RC0402FR-07499RL, "RES 499 OHM 1% 1/16W 0402", Case Code (Imperial)=0402, Case Code (Metric)=1005, LCSC Part Number=C137970, Manufacturer=Yageo, Max Operating Temperature=155°C, Max Power Dissipation=63mW, Min Operating Temperature=-55°C, Package Quantity=1, Power Rating=62.5mW, Resistance Tolerance=1%, Resistor Type="Thick Film", Supplier Part Number 1=603-RC0402FR-07499RL, Temperature Coefficient=100ppm/°C, Voltage Rating=50V, Case/Package=0402, Category="Chip SMD Resistors", ComponentLink1Description=https://datasheet.ciiva.com/2453/pyu-r-int-thick-7-2453539.pdf?src-supplier=Digi-Key, ComponentLink1URL=https://datasheet.ciiva.com/2453/pyu-r-int-thick-7-2453539.pdf?src-supplier=Digi-Key, ComponentLink2Description=https://datasheet.ciiva.com/2453/pyu-r-int-thick-7-2453540.pdf?src-supplier=Digi-Key, ComponentLink2URL=https://datasheet.ciiva.com/2453/pyu-r-int-thick-7-2453540.pdf?src-supplier=Digi-Key, ComponentLink3Description=https://datasheet.ciiva.com/2453/pyu-r-int-thick-7-2453538.pdf?src-supplier=Digi-Key, ComponentLink3URL=https://datasheet.ciiva.com/2453/pyu-r-int-thick-7-2453538.pdf?src-supplier=Digi-Key, Construction=Rectangular, Depth=0.5mm, Features="Moisture Resistant", Height=0.016inch, Lead Free="Lead Free", Length=1mm, Manufacturer Part Number=RC0402FR-07499RL, Military Standard=Not, Number of Terminations=2, Packaging="Tape and Reel", Pricing 1="1=0.10000, 10=0.01200, 50=0.01200, 100=0.00500, 1000=0.00300, 10000=0.00100 (USD)", REACH SVHC="No SVHC", Resistance=499R, RoHS=Yes, RoHS Compliant=Yes, Series=RC, Size Code=0402, Stock 1=936879, Supplier 1=Mouser, Termination=SMD/SMT, Tolerance=1%, Voltage Rating (DC)=50V, Width=0.02inch
R9 R62 R64: library part RC0402FR-07240RL, "RES 240 OHM 1% 1/16W 0402", Case Code (Imperial)=0402, Case Code (Metric)=1005, LCSC Part Number=C114755, Manufacturer=Yageo, Max Operating Temperature=155°C, Max Power Dissipation=63mW, Min Operating Temperature=-55°C, Package Quantity=1, Resistance Tolerance=1%, Resistor Type="Thick Film", Supplier Part Number 1=603-RC0402FR-07240RL, Temperature Coefficient=100ppm/°C, Voltage Rating=50V, Case/Package=0402, ComponentLink1Description=https://datasheet.ciiva.com/7849/1018594-7849915.pdf?src-supplier=Element14, ComponentLink1URL=https://datasheet.ciiva.com/7849/1018594-7849915.pdf?src-supplier=Element14, ComponentLink2Description=https://datasheet.ciiva.com/7849/1018594-7849916.pdf?src-supplier=Element14, ComponentLink2URL=https://datasheet.ciiva.com/7849/1018594-7849916.pdf?src-supplier=Element14, ComponentLink3Description=https://datasheet.ciiva.com/2519/pyu-r-int-thick-7-2519157.pdf?src-supplier=Digi-Key, ComponentLink3URL=https://datasheet.ciiva.com/2519/pyu-r-int-thick-7-2519157.pdf?src-supplier=Digi-Key, ComponentLink4Description=https://datasheet.ciiva.com/2519/pyu-r-int-thick-7-2519158.pdf?src-supplier=Digi-Key, ComponentLink4URL=https://datasheet.ciiva.com/2519/pyu-r-int-thick-7-2519158.pdf?src-supplier=Digi-Key, ComponentLink5Description=https://datasheet.ciiva.com/2519/pyu-r-int-thick-7-2519156.pdf?src-supplier=Digi-Key, ComponentLink5URL=https://datasheet.ciiva.com/2519/pyu-r-int-thick-7-2519156.pdf?src-supplier=Digi-Key, ComponentLink6Description=https://datasheet.ciiva.com/12669/pyu-rc0402-51-rohs-l-6-r-12669689.pdf?src-supplier=Mouser, ComponentLink6URL=https://datasheet.ciiva.com/12669/pyu-rc0402-51-rohs-l-6-r-12669689.pdf?src-supplier=Mouser, ComponentLink7Description=https://datasheet.ciiva.com/17419/pyu-rc0402-51-rohs-l-6-r-17419482.pdf?src-supplier=Future+Electronics, ComponentLink7URL=https://datasheet.ciiva.com/17419/pyu-rc0402-51-rohs-l-6-r-17419482.pdf?src-supplier=Future+Electronics, Construction=Rectangular, Depth=0.5mm, Features="Moisture Resistant", Height=0.016inch, Item Type=Resistors, Lead Free="Lead Free", Length=1mm, Manufacturer Part Number=RC0402FR-07240RL, Military Standard=Not, Number of Terminations=2, Packaging="Tape and Reel", Power Rating=63mW, Pricing 1="1=0.10000, 10=0.01200, 50=0.01200, 100=0.00500, 1000=0.00300, 10000=0.00100 (USD)", REACH SVHC=Unknown, Resistance=240R, RoHS=Yes, RoHS Compliant=Yes, Series=RC, Size Code=0402, Stock 1=1903202, Supplier 1=Mouser, Termination=SMD/SMT, Tolerance=1%, Voltage Rating (DC)=50V, Width=0.02inch
R10 R11 R12 R13 R14 R15 R16 R17 R18 R19 R20 R21 R22 R23 R24 R25 R26 R27 R28 R29 R30 R31 R35 R36 R37 R38 R39 R40 R41 R42 R43 R44 R45 R46 R47 R48 R49 R50 R51 R52 R53 R54 R55 R56 R57 R73 R74 R75 R77 R78 R79 R80 R82 R84 R85: library part RC0402FR-070RL, "RES 0 OHM JUMPER 1/16W 0402", Case Code (Imperial)=0402, Case Code (Metric)=1005, LCSC Part Number=C106231, Manufacturer=Yageo, Max Operating Temperature=155°C, Max Power Dissipation=63mW, Min Operating Temperature=-55°C, Power Rating=62.5mW, Resistor Type="Thick Film", Supplier Part Number 1=603-RC0402FR-070RL, Temperature Coefficient=200ppm/°C, Tolerance=1%, Voltage Rating=50V, Case/Package=0402, ComponentLink1Description=https://datasheet.ciiva.com/8896/pyu-rc0402-51-rohs-l-6-8896149.pdf?src-supplier=Avnet, ComponentLink1URL=https://datasheet.ciiva.com/8896/pyu-rc0402-51-rohs-l-6-8896149.pdf?src-supplier=Avnet, ComponentLink2Description=https://datasheet.ciiva.com/16790/pyu-rc0402-51-rohs-l-6-r-16790444.pdf?src-supplier=Future+Electronics, ComponentLink2URL=https://datasheet.ciiva.com/16790/pyu-rc0402-51-rohs-l-6-r-16790444.pdf?src-supplier=Future+Electronics, Contact Plating=Tin,Matte, Features="Moisture Resistant", Height=0.35mm, Item Type=Resistors, Lead Free="Lead Free", Length=1mm, Manufacturer Part Number=RC0402FR-070RL, Mount="Surface Mount", Number of Terminations=2, Packaging="Tape and Reel", Pricing 1="1=0.10000, 10=0.01400, 50=0.01400, 100=0.00600, 1000=0.00300, 5000=0.00200, 10000=0.00100 (USD)", Radiation Hardening=No, Resistance=0R, RoHS=Yes, RoHS Compliant=Yes, Series=RC, Size Code=0402, Stock 1=8556842, Supplier 1=Mouser, Termination=SMD/SMT, Width=0.5mm
R32 R33 R34 R58 R59 R60 R72 R83 R87 R92 R101 R110 R119: library part RC0402FR-0710KL, "RES 10K OHM 1% 1/16W 0402", Case Code (Imperial)=0402, Case Code (Metric)=1005, LCSC Part Number=C60490, Manufacturer=Yageo, Max Operating Temperature=155°C, Max Power Dissipation=63mW, Min Operating Temperature=-55°C, Power Rating=62.5mW, Resistance=10kR, Resistance Tolerance=1%, Resistor Type="Thick Film", Supplier Part Number 1=603-RC0402FR-0710KL, Temperature Coefficient=100ppm/°C, Voltage Rating=50V, Case/Package=0402, Category="Chip SMD Resistors", ComponentLink1Description=https://datasheet.ciiva.com/7660/38568-7660787.pdf?src-supplier=Element14, ComponentLink1URL=https://datasheet.ciiva.com/7660/38568-7660787.pdf?src-supplier=Element14, ComponentLink2Description=https://datasheet.ciiva.com/7849/1686128-7849814.pdf?src-supplier=Element14, ComponentLink2URL=https://datasheet.ciiva.com/7849/1686128-7849814.pdf?src-supplier=Element14, ComponentLink3Description=https://datasheet.ciiva.com/7983/1018594-7983486.pdf?src-supplier=Element14, ComponentLink3URL=https://datasheet.ciiva.com/7983/1018594-7983486.pdf?src-supplier=Element14, ComponentLink4Description=https://datasheet.ciiva.com/22747/1018594-22747512.pdf?src-supplier=Element14, ComponentLink4URL=https://datasheet.ciiva.com/22747/1018594-22747512.pdf?src-supplier=Element14, ComponentLink5Description=https://datasheet.ciiva.com/12667/pyu-rc0402-51-rohs-l-6-r-12667067.pdf?src-supplier=Mouser, ComponentLink5URL=https://datasheet.ciiva.com/12667/pyu-rc0402-51-rohs-l-6-r-12667067.pdf?src-supplier=Mouser, ComponentLink6Description=https://datasheet.ciiva.com/7849/1784430-7849813.pdf?src-supplier=Element14, ComponentLink6URL=https://datasheet.ciiva.com/7849/1784430-7849813.pdf?src-supplier=Element14, ComponentLink7Description=https://datasheet.ciiva.com/7849/1784430-7849815.pdf?src-supplier=Element14, ComponentLink7URL=https://datasheet.ciiva.com/7849/1784430-7849815.pdf?src-supplier=Element14, Construction=Rectangular, Depth=0.5mm, Features="Moisture Resistant", Height=0.32mm, Item Type=Resistor, Lead Free="Lead Free", Lead Pitch=0.2mm, Length=1mm, Manufacturer Part Number=RC0402FR-0710KL, Military Standard=Not, Number of Pins=2, Number of Terminations=2, Packaging="Tape and Reel", Pricing 1="1=0.10000, 10=0.01400, 50=0.01400, 100=0.00500, 1000=0.00300, 10000=0.00200 (USD)", REACH SVHC="No SVHC", RoHS=Yes, RoHS Compliant=Yes, Series=RC, Stock 1=18648329, Supplier 1=Mouser, Termination=SMD/SMT, Tolerance=1%, Voltage Rating (DC)=50V, Width=0.5mm, Working Voltage=50V
R61 R76 R88 R89 R90: library part RC0402JR-0775RL, "RES 75 OHM 5% 1/16W 0402", Case Code (Imperial)=0402, Case Code (Metric)=1005, LCSC Part Number=C137841, Manufacturer=Yageo, Max Operating Temperature=155°C, Max Power Dissipation=63mW, Min Operating Temperature=-55°C, Power Rating=62.5mW, Resistance Tolerance=5%, Resistor Type="Thick Film", Supplier Part Number=311-75JRCT-ND, Temperature Coefficient=100ppm/°C, Voltage Rating=50V, Case/Package=0402, ComponentLink1Description=https://datasheet.ciiva.com/7983/1018594-7983612.pdf?src-supplier=Element14, ComponentLink1URL=https://datasheet.ciiva.com/7983/1018594-7983612.pdf?src-supplier=Element14, ComponentLink2Description=https://datasheet.ciiva.com/17082/pyu-rc0402-51-rohs-l-6-r-17082239.pdf?src-supplier=Future+Electronics, ComponentLink2URL=https://datasheet.ciiva.com/17082/pyu-rc0402-51-rohs-l-6-r-17082239.pdf?src-supplier=Future+Electronics, Contact Plating=Tin,Lead, Features="Moisture Resistant", Height=0.35mm, Item Type=Resistor, Lead Free="Lead Free", Length=1mm, Manufacturer Part Number=RC0402JR-0775RL, Number of Terminations=2, Packaging="Tape and Reel", Pins=2, Pricing="1=0.1, 10=0.018, 50=0.0102, 100=0.0083, 500=0.00528, 1000=0.00444, 5000=0.00307 (USD)", Reach SVHC Compliant=No, RoHS=Yes, RoHS Compliant=Yes, Series=RC, Stock=2993323, Supplier=Digikey, Termination=SMD/SMT, Tolerance=5%, Voltage Rating (DC)=50V, Width=0.5mm